# Altium PCB LSS-P-PCB-B v3.4.PcbDoc (part 1 of 3)
Units mil, origin at the board's own origin, x right, y up, seen from the top; angles counter-clockwise.
Board outline 2702.17 x 2795.23 mil, 4 copper layers (Top Layer, Power, GND, Bottom Layer), stack 62.08 mil thick; 111 components, 108 nets, 410 pads, 256 vias.
Unrouted connection lines stored in the file: 1.
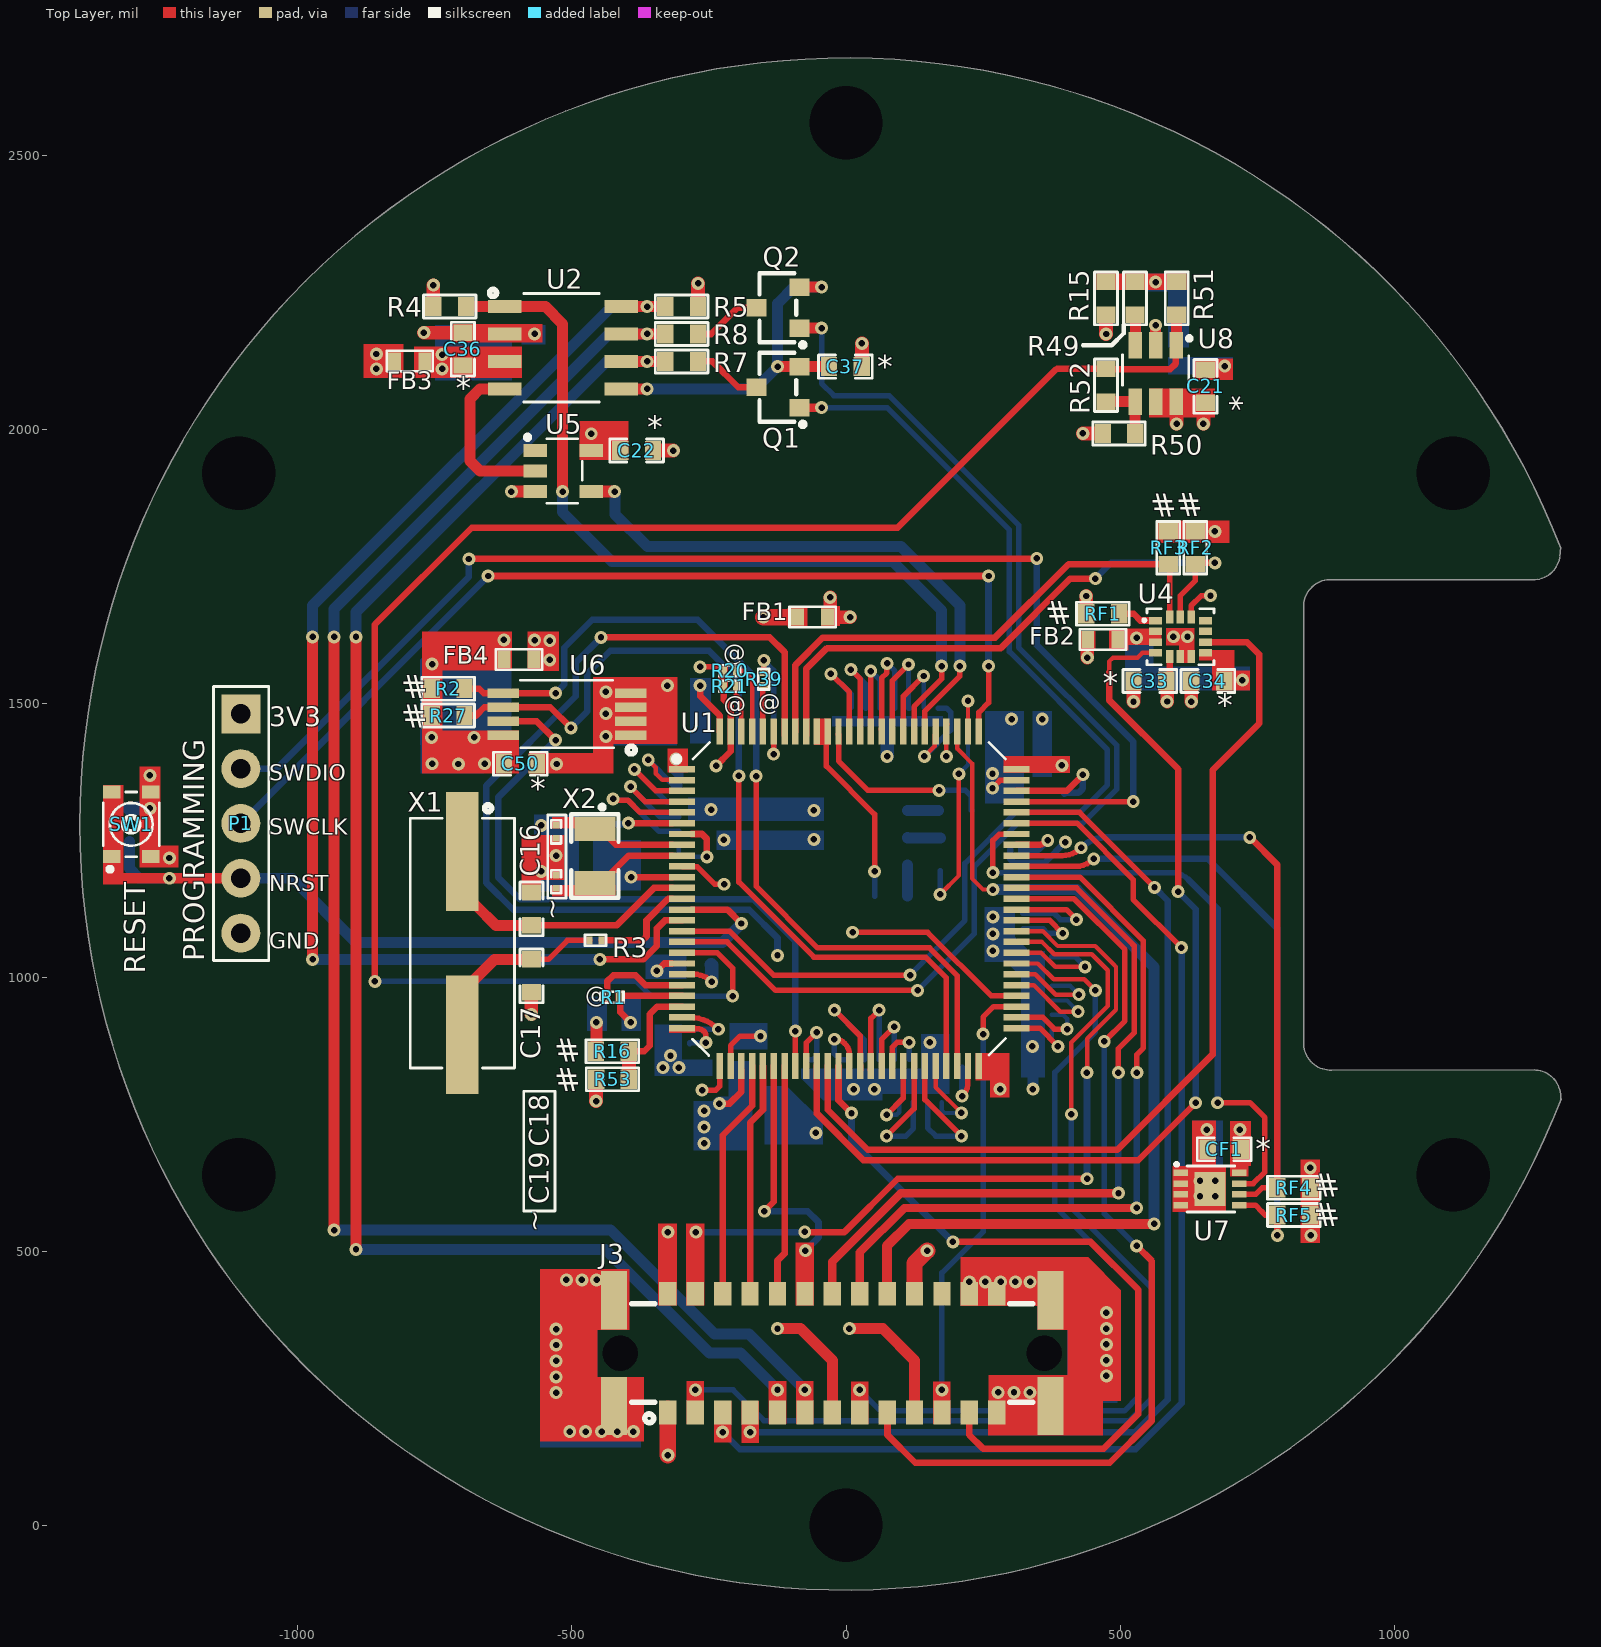
[diagram p0: Top Layer view]
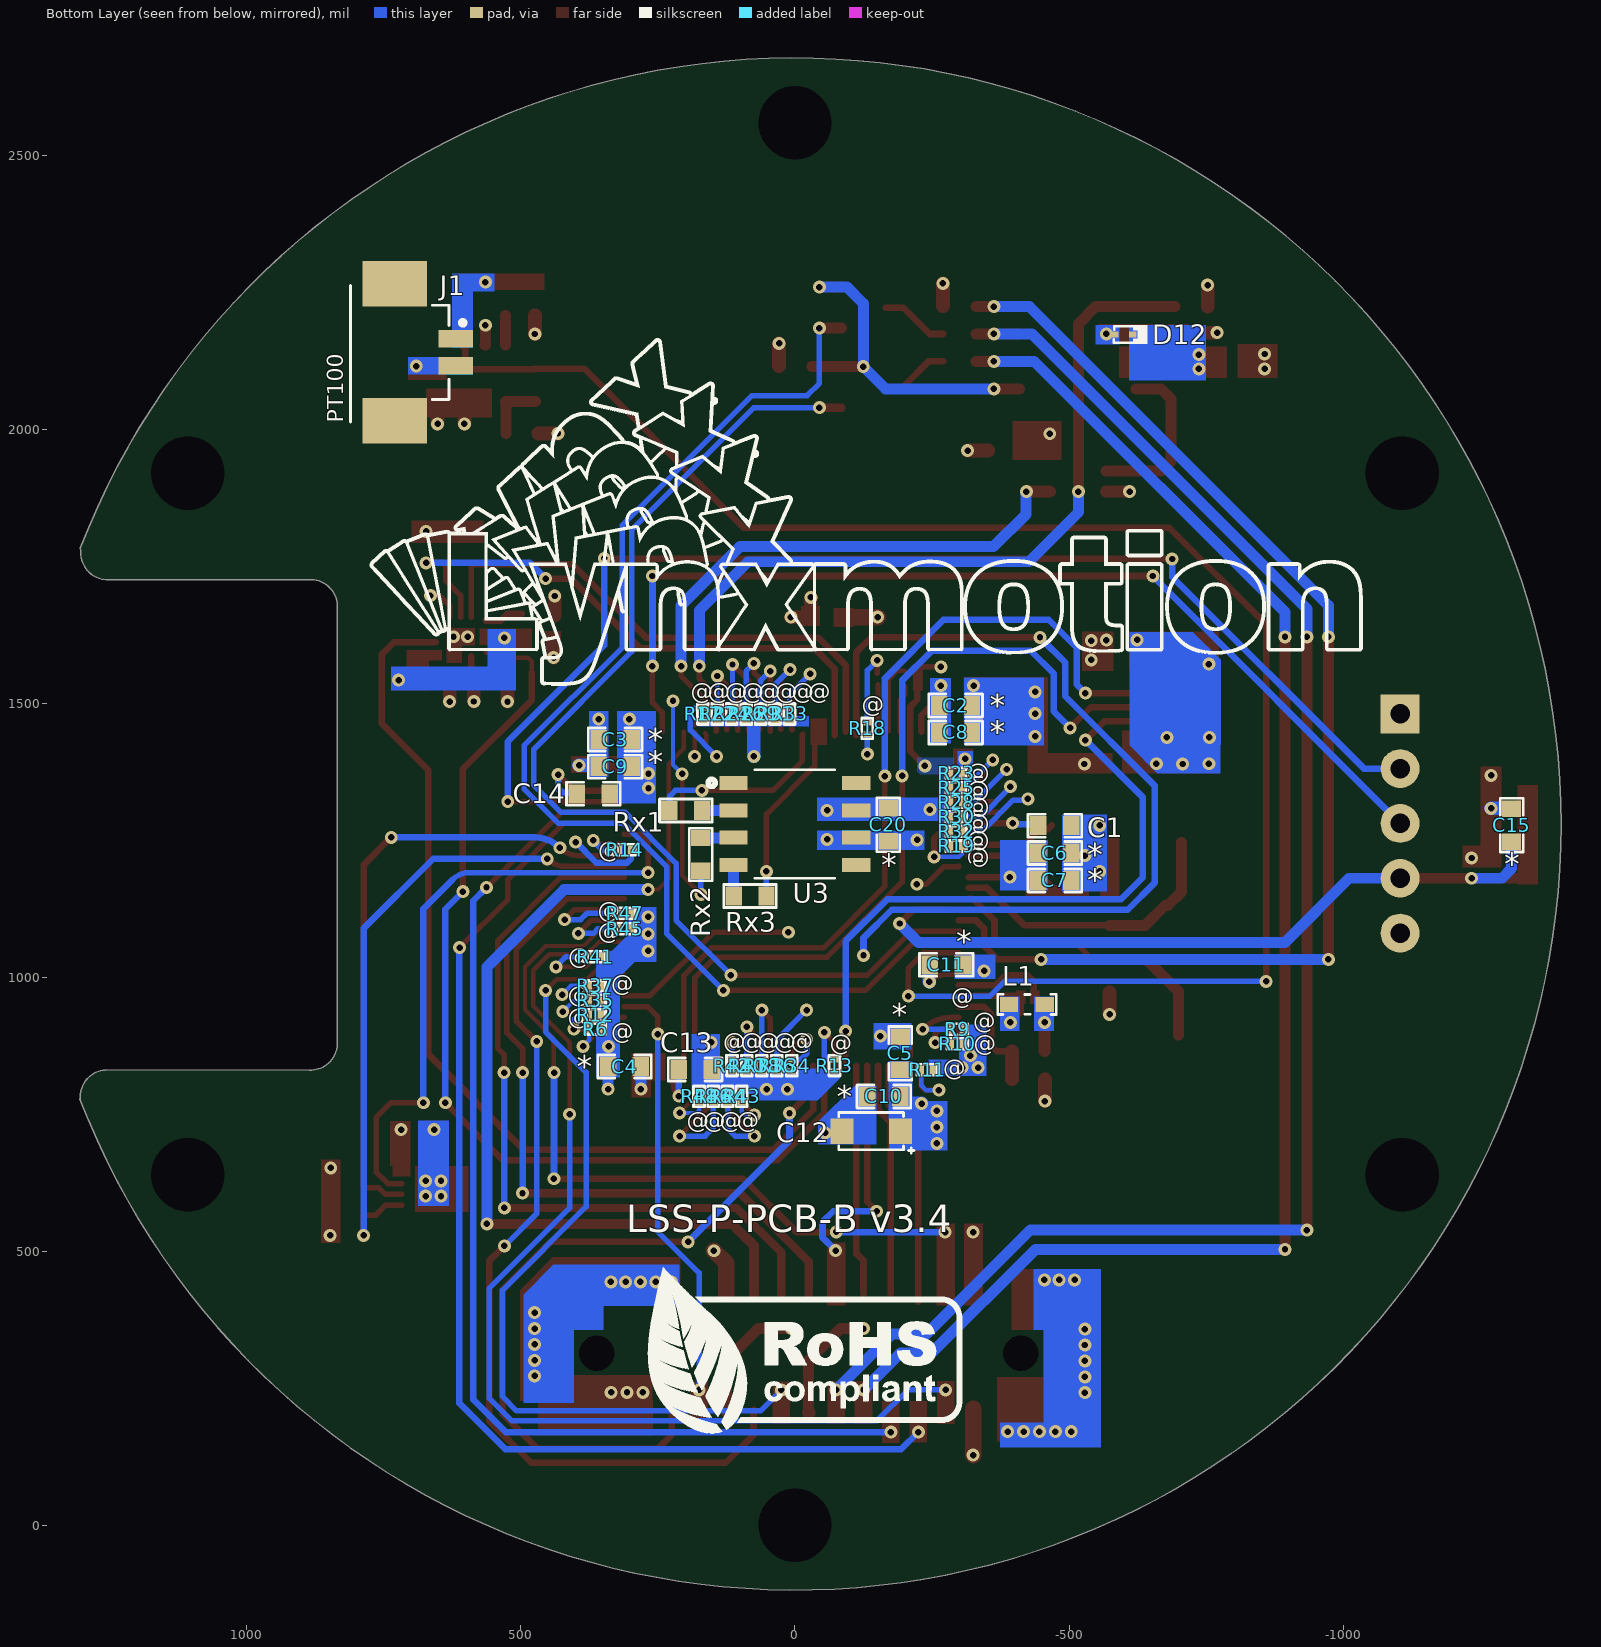
[diagram p1: Bottom Layer view, seen from below]
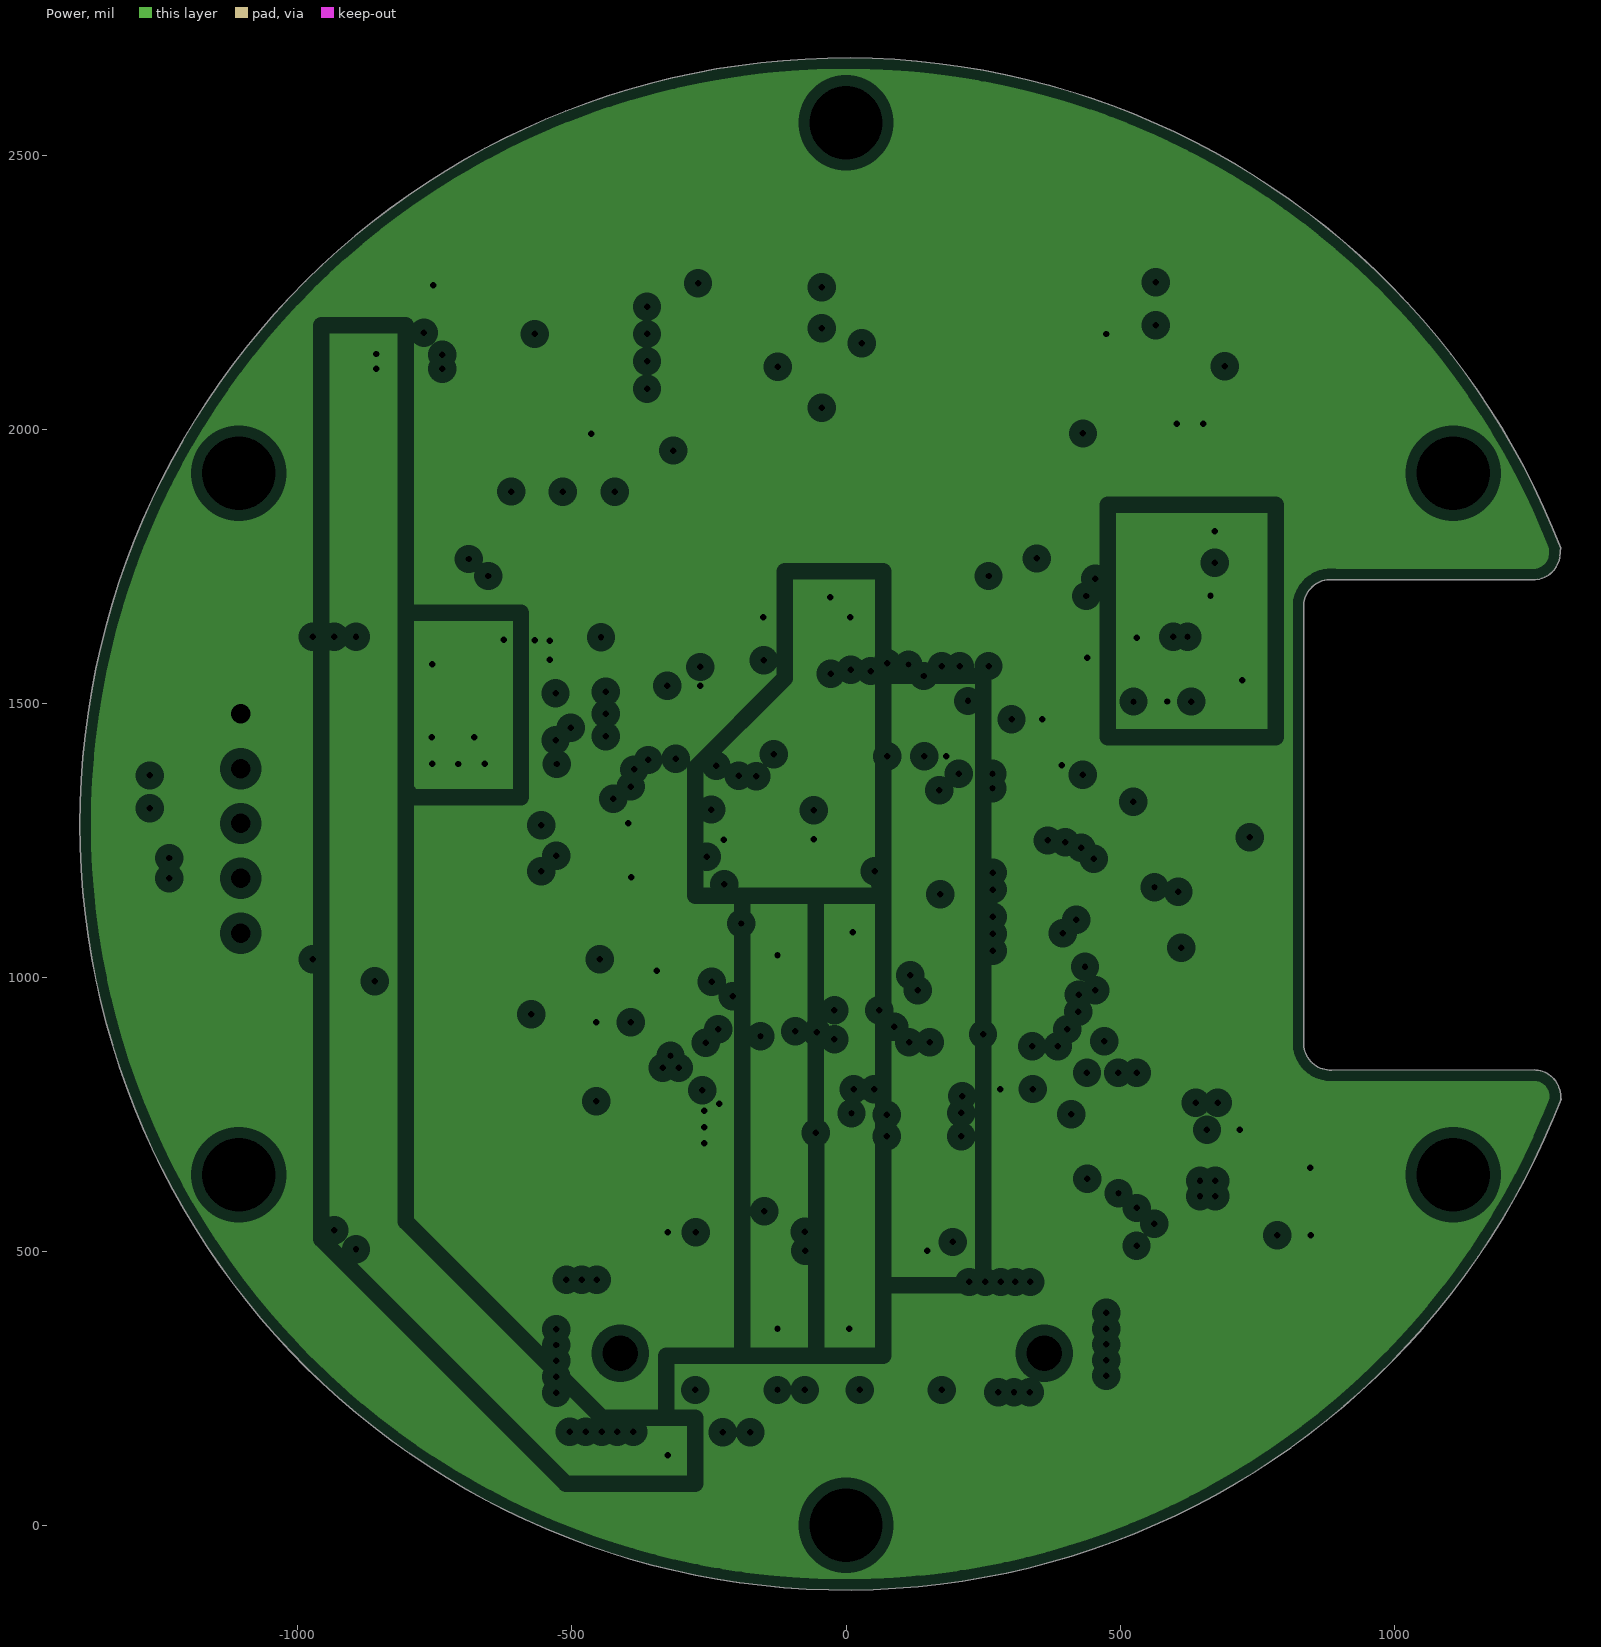
[diagram p2: Power, clearances drawn from the general rule]
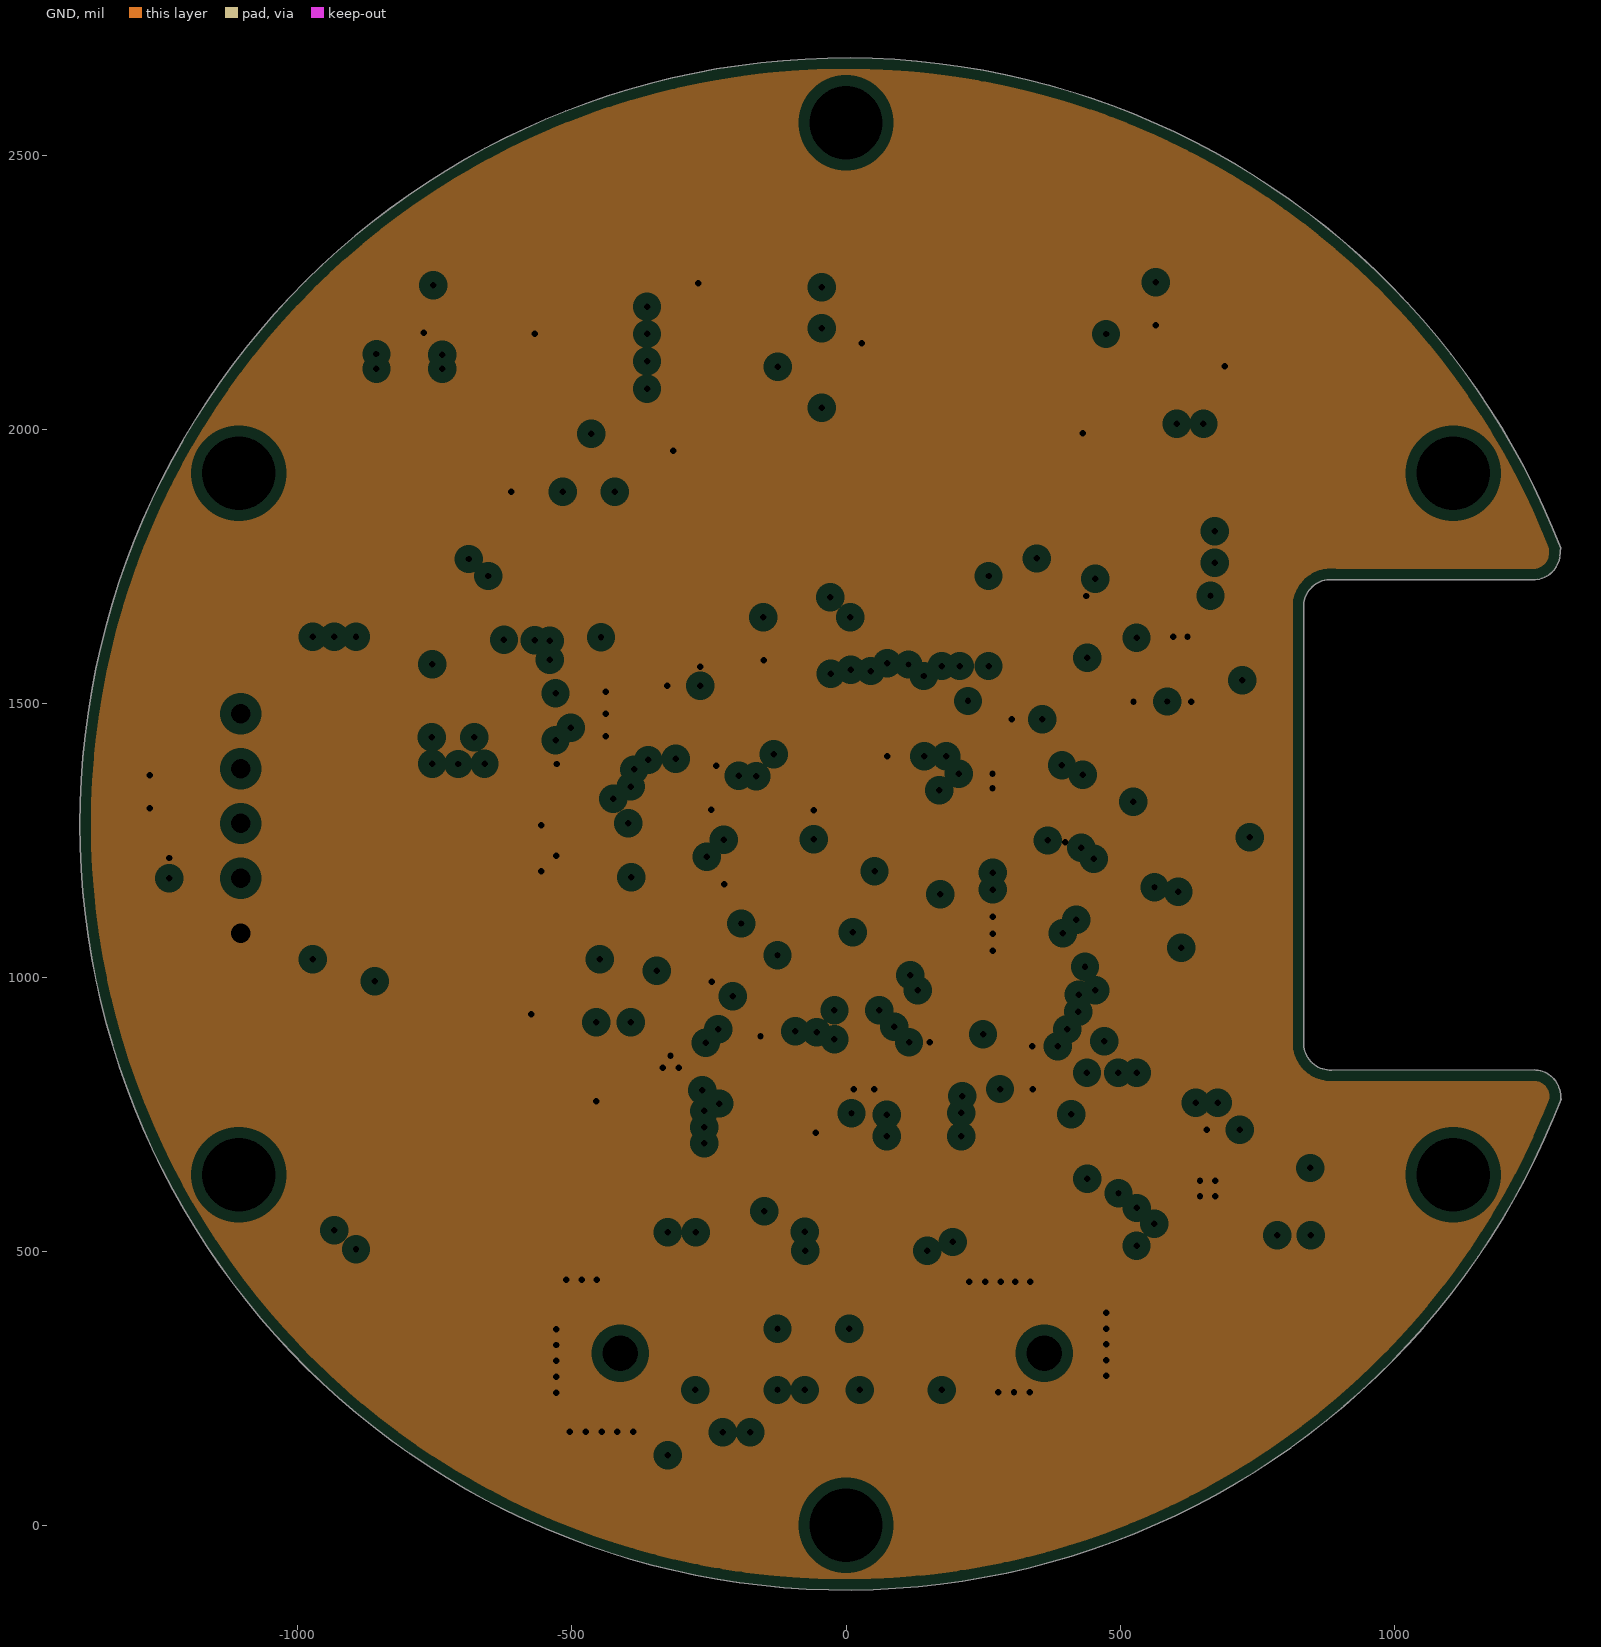
[diagram p3: GND, clearances drawn from the general rule]

## Layer stack, top to bottom
Top Solder: solder mask 0.5, Solder Resist, Dk 3.5
Top Layer: signal copper 1.7
Prepreg 1: prepreg 5, PP-015, Dk 4.3
Power: plane copper 1.7, net (Multiple Nets)
Core: core 45.28, FR-4, Dk 4.8
GND: plane copper 1.7, net GND
Prepreg 2: prepreg 5, PP-015, Dk 4.3
Bottom Layer: signal copper 1.7
Bottom Solder: solder mask 0.5, Solder Resist, Dk 3.5

## Board outline
835.4,885.52 ccw(c884,879.5) 886.01,830.57 886.01,830.67 1255.51,830.94 1258.51,830.61 cw(c1254.9,781.78) 1303.74,778.24 1304.53,777.94 cw(c0,1279.53) 1303.84,1782.91 1302.74,1777.49 cw(c1253.9,1773.96) 1257.51,1725.12 889.44,1725.12 889.44,1725.22 ccw(c884,1676.55) 835.4,1670.54

## Design rules (kind name [scope] priority, off if disabled: settings)
Clearance [All] p1: gap=7 ignorepadtopadclearanceinfootprint=FALSE except(5: Arc-SMDPad Track-SMDPad SMDPad-SMDPad)
ComponentClearance [All] p1: gap=1 collisioncheckmode=3 verticalgap=1 showdistances=FALSE
Height [All] p1: minheight=0 maxheight=10000 prefheight=500
HoleSize [All] p1: absolutevalues=TRUE maxlimit=1000 minlimit=1 maxpercent=80.000 minpercent=20.000
HoleToHoleClearance [All] p1: gap=0 allowstackedmicrovias=TRUE
MinimumSolderMaskSliver [All] p1: minsoldermaskwidth=0
PlaneClearance [All] p1: clearance=20
PlaneConnect [All] p1: planeconnectstyle=Direct reliefexpansion=20 reliefentries=4 reliefconductorwidth=10 reliefairgap=10
PolygonConnect [All] p1: connectstyle=Direct reliefconductorwidth=10 reliefentries=4 polygonreliefangle="90 Angle" airgapwidth=10
RoutingVias [All] p1: holewidth=11.81 width=23.62 viastyle="Through Hole" minholewidth=11.81 minwidth=23.62 maxholewidth=31.5 maxwidth=62.99
SilkToSilkClearance [All] p1: silktosilkclearance=0
SilkToSolderMaskClearance [IsPad] p1: minsilkscreentomaskgap=0 clearancetoexposedcopper=TRUE
SolderMaskExpansion SolderMaskExpansion_1 [Not IsVia] p1: expansion=4 istentingtop=FALSE
SolderMaskExpansion [IsVia] p2: expansion=6 istentingtop=TRUE soldermaskfromhole=TRUE
Width [All] p1: maxlimit=100 minlimit=8 preferedwidth=12
21 further rules are at their usual default settings.

## Classes and differential pairs
component class U_Temp_Probe_Section: C21 J1 R15 R49 R50 R51 R52 U8
component class U_Sensor-Section: C50 FB4 R2 R27 U6
component class U_Processing-Section: C1 C2 C3 C4 C5 C6 C7 C8 C9 C10 C11 C12 C13 C14 C15 C16 C17 C18 C19 CF1 L1 R1 R3 R6 R9 R10 R11 R12 R13 R14 R16 R17 R18 R19 R20 R21 R22 R23 R24 R25 R26 R28 R29 R30 R31 R32 R33 R34 R35 R36 R37 R38 R39 R40 R41 R42 R43 R44 R45 R46 R47 R48 R53 RF4 RF5 SW1 U1 U7 X1 X2
component class U_Motion-Sensor-Sheet: C33 C34 FB2 RF1 RF2 RF3 U4
component class U_Encoder-Sheet: C20 FB1 Rx1 Rx2 Rx3 U3
component class U_Connector-Section: J3 P1
component class U_CAN-Sheet: C22 C36 C37 D12 FB3 Q1 Q2 R4 R5 R7 R8 U2 U5

## Components (designator, comment, footprint, x,y, rotation, side; value= is the part's Value field where it differs from the comment)
C1 "4.7UF" Cap0603 -474,1276.53 r180 bottom locked
C2 "0.1UF" Cap0603 -293,1495.53 r180 bottom locked
C3 "0.1UF" Cap0603 328,1433.53 r180 bottom locked
C4 "0.1UF" Cap0603 311,837 r0 bottom
C5 "0.1UF" Cap0603 -192,861.16 r90 bottom locked
C6 "0.1UF" Cap0603 -474,1226.53 r180 bottom locked
C7 "0.1UF" Cap0603 -474,1176.53 r180 bottom locked
C8 "0.1UF" Cap0603 -293,1446.53 r180 bottom locked
C9 "0.1UF" Cap0603 328,1384.16 r180 bottom locked
C10 "0.1uF" Cap0603 -162,782.53 r0 bottom locked
C11 "0.1UF" Cap0603 -276,1022.53 r0 bottom
C12 "1UF" "CAP-CASE A" -139,719 r0 bottom locked
C13 "2.2uF" "Cap 0603" 182,831.53 r0 bottom locked
C14 "2.2uF" "Cap 0603" 368,1334.53 r0 bottom locked
C15 "0.1UF" Cap0603 -1307.5,1277.53 r90 bottom locked
C16 "30pF" "Cap 0603" -574,1124.53 r270 top
C17 "30pF" "Cap 0603" -574,1002.53 r90 top
C18 "10pF" "CAP 0201" -529,1265.16 r90 top locked
C19 "10pF" "CAP 0201" -529,1174.16 r270 top locked
C20 "0.1uF" "Cap 0603" -170,1278 r90 bottom
C21 "0.1UF" "Cap 0603" 656,2078 r90 top
C22 "0.1uF" "Cap 0603" -382.19,1960.93 r0 top locked
C33 "0.1UF" Cap0603 554.5,1540.34 r180 top
C34 "0.1UF" Cap0603 660,1540.34 r180 top
C36 "0.1UF" Cap0603 -699,2146 r90 top locked
C37 "0.1UF" Cap0603 -1,2114 r0 top
C50 "0.1UF" Cap0603 -594,1389.47 r0 top
CF1 "0.1uF" "Cap 0603" 690,686 r180 top locked
D12 "ESD9L5.0ST5G" SOD-923 -599.54,2172.53 r0 bottom locked
FB1 "MPZ1608S121ATDH5" MPZ1608S121ATDH5 -61.13,1657 r0 top locked
FB2 "MPZ1608S121ATDH5" MPZ1608S121ATDH5 468.56,1616 r0 top locked
FB3 "MPZ1608S121ATDH5" MPZ1608S121ATDH5 -796.12,2124 r0 top locked
FB4 "MPZ1608S121ATDH5" MPZ1608S121ATDH5 -596.5,1580 r180 top
J1 "1.25-2PWB" 1.25-2PWB 682,2140 r270 bottom locked
J3 "M55-6012642R" M55-6012642R -25,314.26 r0 top locked
L1 "FBMH1608HL121-TV" "IND 0603" -423,950.52 r0 bottom
P1 "SMC-1-05-1-GT" SMC-1-05-1-GT -1104,1280.53 r270 top locked
Q1 "MMBT2222A-7-F" SOT-23 -124,2076.53 r90 top locked
Q2 "MMBT2222A-7-F" SOT-23 -124,2221.53 r90 top locked
R1 "0R" Res-0201 -425,963.53 r0 top locked
R2 "10K" Res0603 -726,1526.47 r180 top locked
R3 "806R" Res-0201 -457.02,1067.34 r180 top locked
R4 "1K" Res0603 -723,2223.53 r180 top locked
R5 "1K" Res0603 -300,2223.53 r0 top locked
R6 "0R" Res-0201 364.83,905.4 r180 bottom
R7 "57R6" Res0603 -300,2123.53 r180 top locked
R8 "57R6" Res0603 -300,2173.53 r180 top locked
R9 "0R" Res-0201 -295.83,905.03 r0 bottom
R10 "0R" Res-0201 -295.83,878.53 r0 bottom
R11 "0R" Res-0201 -241.05,831.04 r0 bottom locked
R12 "0R" Res-0201 364.83,931.66 r180 bottom
R13 "0R" Res-0201 -72,838.7 r90 bottom locked
R14 "0R" Res-0201 310.17,1232.53 r0 bottom locked
R15 "3.01K" Res0603 474.4,2238.44 r90 top
R16 "DNP" Res0603 -426.19,865 r0 top
R17 "0R" Res-0201 168,1480.28 r90 bottom locked
R18 "0R" Res-0201 -132,1454 r90 bottom
R19 "0R" Res-0201 -294,1239.53 r180 bottom locked
R20 "0R" Res-0201 -212,1559 r0 top
R21 "0R" Res-0201 -212,1531 r0 top
R22 "0R" Res-0201 141.67,1480.28 r270 bottom locked
R23 "0R" Res-0201 -294,1372.04 r180 bottom locked
R24 "0R" Res-0201 115.33,1480.28 r270 bottom locked
R25 "0R" Res-0201 -294,1345.81 r180 bottom locked
R26 "0R" Res-0201 89,1480.28 r270 bottom locked
R27 "10K" Res0603 -726,1477.47 r180 top locked
R28 "0R" Res-0201 -294,1319.24 r180 bottom locked
R29 "0R" Res-0201 62.67,1480.28 r270 bottom locked
R30 "0R" Res-0201 -294,1292.67 r180 bottom locked
R31 "0R" Res-0201 36.33,1480.28 r270 bottom locked
R32 "0R" Res-0201 -294,1266.1 r180 bottom locked
R33 "0R" Res-0201 10,1480.28 r270 bottom locked
R34 "0R" Res-0201 6,838.7 r90 bottom locked
R35 "0R" Res-0201 364.83,957.93 r180 bottom
R36 "0R" Res-0201 33.25,838.7 r90 bottom locked
R37 "0R" Res-0201 364.83,984.19 r180 bottom
R38 "0R" Res-0201 60.5,838.7 r90 bottom locked
R39 "0R" Res-0201 -150,1544 r90 top
R40 "0R" Res-0201 87.75,838.7 r90 bottom locked
R41 "0R" Res-0201 364.83,1037.53 r180 bottom locked
R42 "0R" Res-0201 115,838.7 r90 bottom locked
R43 "0R" Res-0201 97,782.53 r270 bottom locked
R44 "0R" Res-0201 123,782.53 r270 bottom locked
R45 "0R" Res-0201 310.17,1088.53 r180 bottom locked
R46 "0R" Res-0201 149,782.53 r270 bottom locked
R47 "0R" Res-0201 310.17,1116.53 r180 bottom locked
R48 "0R" Res-0201 175,782.53 r270 bottom locked
R49 "11K" Res0603 527.4,2238.44 r90 top
R50 "12.4K" Res0603 498,1992 r180 top
R51 "11.8K" Res0603 603.4,2238.44 r270 top
R52 "105K" Res0603 474.4,2080 r90 top
R53 "DNP" Res0603 -426,814 r0 top
RF1 "10K" Res0603 468.69,1663 r0 top locked
RF2 "10K" Res0603 637,1783.53 r90 top locked
RF3 "10K" Res0603 588,1783.53 r90 top locked
RF4 "10K" Res0603 817,616 r180 top locked
RF5 "10K" Res0603 817,566 r180 top locked
Rx1 "100R" Res0603 199,1304 r0 bottom locked
Rx2 "100R" Res0603 172,1224 r270 bottom locked
Rx3 "470R" Res0603 82,1148 r180 bottom locked
SW1 "GT-TC025D-H0065-L1" GT-TC025D-H0065-L1 -1304,1279 r90 top locked
U1 "STM32F407VET6" LQFP-100 6,1143.16 r0 top locked
U2 "SN65HVDA1040AQDRQ1" SOIC-8 -516,2148.53 r0 top locked
U3 "TLE5012BE1000" PG-DSO-8 0,1279.53 r180 bottom locked
U4 "LSM6DSLTR" "14 LGA (2.5x3)" 610.17,1621.15 r0 top locked
U5 "SN74LV1T34DBVR" SOT-23-5 -516,1923.53 r0 top locked
U6 "MCP9805-BE/ST" 8-TSSOP -509,1479.84 r180 top locked
U7 "CAT24C32HU4I-GT3" "8-UDFN-EP (2x3)" 664,613.53 r0 top locked
U8 "MAX4236EUT+T" SOT-23-6 565.4,2101.44 r270 top locked
X1 "20MHz" HCM4920000000ABJT -699,1063.21 r270 top locked
X2 "ECS-.327-7-34B-C-TR" ECS-.327-7-34B-C-TR -458,1221.16 r270 top locked

## Footprints (in the part's own frame and the unit in brackets; to place one, negate y for a bottom-side part, rotate by r counter-clockwise, add the part's x,y. Pads: shape width x height; smd on the part's side, far side on the other; paste and mask are expansions set on the pad)
1.25-2PWB [mm]
  rect 0.8x1.6 smd: 1(-0.625,1.6) 2(0.625,1.6)
  rect 2.1x3 smd: MP1(-3.175,-1.219) MP2(3.175,-1.219)
  silkscreen extent -3.1,-3.28 3.23,1.96, body extent -3.62,-3.21 3.63,2.04, height 3.5
8-TSSOP [mm] "IC SENSOR THERMAL 3.0V 8TSSOP"
  rect 1.45x0.45 smd: 1(-2.95,0.975) 2(-2.95,0.325) 3(-2.95,-0.325) 4(-2.95,-0.975) 5(2.95,-0.975) 6(2.95,-0.325) 7(2.95,0.325) 8(2.95,0.975)
  silkscreen extent -3.15,-1.57 2.17,1.84, body extent -3.2,-1.55 3.2,1.55, height 1.09
"8-UDFN-EP (2x3)" [mm]
  rect 0.68x0.3 smd: 1(-1.36,0.75) 2(-1.36,0.25) 3(-1.36,-0.25) 4(-1.36,-0.75) 5(1.36,-0.75) 6(1.36,-0.25) 7(1.36,0.25) 8(1.36,0.75)
  rect 1.45x1.56 smd: 9(0,0)
  silkscreen extent -1.57,-1.07 1.14,1.17, body extent -1.55,-1 1.55,1, height 0.81
"14 LGA (2.5x3)" [mm]
  rect 0.61x0.35 smd paste+0 mask+0.055: 1(-1.16,0.75) 2(-1.16,0.25) 3(-1.16,-0.25) 4(-1.16,-0.75) 8(1.16,-0.75) 9(1.16,-0.25) 10(1.16,0.25) 11(1.16,0.75)
  rect 0.35x0.61 smd paste+0 mask+0.055: 5(-0.5,-0.91) 6(0,-0.91) 7(0.5,-0.91) 12(0.5,0.91) 13(0,0.91) 14(-0.5,0.91)
  silkscreen extent -1.75,-1.3 1.55,1.3, body extent -1.5,-1.25 1.5,1.25, height 0.95
Cap0603 [mil]
  rect 30x35 smd mask+2.36: 1(-30,0) 2(30,0)
  silkscreen extent -49,-21 49,21, body extent -32,-16 31,16, height 34
"CAP 0201" [mm]
  rect 0.3x0.3 smd mask+0.055: 1(-0.3,0) 2(0.3,0)
  silkscreen extent -0.53,-0.23 0.53,0.23, body extent -0.3,-0.15 0.3,0.15, height 0.28
"Cap 0603" [mil]
  rect 30x35 smd mask+2.36: 1(-30,0) 2(30,0)
  silkscreen extent -49,-21 49,21, body extent -32,-16 31,16, height 34
"CAP-CASE A" [mm]
  rect 1.06x1.19 smd: 1(-1.355,0) 1(-1.355,0) 2(1.355,0)
  silkscreen extent -1.98,-0.86 1.5,1.01, body extent -1.6,-0.8 1.6,0.8, height 1.8
ECS-.327-7-34B-C-TR [mm] "CRYSTAL 32.7680KHZ 12.5PF SMD"
  rect 1.1x1.9 smd: 1(-1.25,0) 2(1.25,0)
  silkscreen extent -2.34,-1.09 1.93,1.09, body extent -1.6,-0.78 1.6,0.72, height 0.87
GT-TC025D-H0065-L1 [mm]
  rect 0.6x0.8 smd: 1(-1.5,0.9) 2(1.5,0.9) 3(1.5,-0.9) 4(-1.5,-0.9)
  silkscreen extent -2.16,-1.3 1.5,1.3, body extent -1.7,-1.3 1.7,1.3, height 0.6
HCM4920000000ABJT [mm] "CRYSTAL 20.0000MHZ 18PF SMD"
  rect 5.5x1.5 smd: 1(-4.225,-0.025) 2(4.275,-0.025)
  silkscreen extent -6.39,-2.44 5.82,2.39, body extent -6.37,-2.44 6.43,2.39, height 4.3
"IND 0603" [mm]
  rect 0.85x0.7 smd: 1(-0.825,0) 2(0.825,0)
  silkscreen extent -1.36,-0.47 1.35,0.47, body extent -0.8,-0.4 0.8,0.4, height 0.8
LQFP-100 [mm]
  rect 1.2x0.3 smd: 1(-7.75,6) 2(-7.75,5.5) 3(-7.75,5) 4(-7.75,4.5) 5(-7.75,4) 6(-7.75,3.5) 7(-7.75,3) 8(-7.75,2.5) 9(-7.75,2) 10(-7.75,1.5) 11(-7.75,1) 12(-7.75,0.5) 13(-7.75,0) 14(-7.75,-0.5) 15(-7.75,-1) 16(-7.75,-1.5) 17(-7.75,-2) 18(-7.75,-2.5) 19(-7.75,-3) 20(-7.75,-3.5) 21(-7.75,-4) 22(-7.75,-4.5) 23(-7.75,-5) 24(-7.75,-5.5) 25(-7.75,-6) 51(7.75,-6) 52(7.75,-5.5) 53(7.75,-5) 54(7.75,-4.5) 55(7.75,-4) 56(7.75,-3.5) 57(7.75,-3) 58(7.75,-2.5) 59(7.75,-2) 60(7.75,-1.5) 61(7.75,-1) 62(7.75,-0.5) 63(7.75,0) 64(7.75,0.5) 65(7.75,1) 66(7.75,1.5) 67(7.75,2) 68(7.75,2.5) 69(7.75,3) 70(7.75,3.5) 71(7.75,4) 72(7.75,4.5) 73(7.75,5) 74(7.75,5.5) 75(7.75,6)
  rect 0.3x1.2 smd: 26(-6,-7.75) 27(-5.5,-7.75) 28(-5,-7.75) 29(-4.5,-7.75) 30(-4,-7.75) 31(-3.5,-7.75) 32(-3,-7.75) 33(-2.5,-7.75) 34(-2,-7.75) 35(-1.5,-7.75) 36(-1,-7.75) 37(-0.5,-7.75) 38(0,-7.75) 39(0.5,-7.75) 40(1,-7.75) 41(1.5,-7.75) 42(2,-7.75) 43(2.5,-7.75) 44(3,-7.75) 45(3.5,-7.75) 46(4,-7.75) 47(4.5,-7.75) 48(5,-7.75) 49(5.5,-7.75) 50(6,-7.75) 76(6,7.75) 77(5.5,7.75) 78(5,7.75) 79(4.5,7.75) 80(4,7.75) 81(3.5,7.75) 82(3,7.75) 83(2.5,7.75) 84(2,7.75) 85(1.5,7.75) 86(1,7.75) 87(0.5,7.75) 88(0,7.75) 89(-0.5,7.75) 90(-1,7.75) 91(-1.5,7.75) 92(-2,7.75) 93(-2.5,7.75) 94(-3,7.75) 95(-3.5,7.75) 96(-4,7.75) 97(-4.5,7.75) 98(-5,7.75) 99(-5.5,7.75) 100(-6,7.75)
  silkscreen extent -8.13,-7.27 7.24,7.24, body extent -8,-8 8,8, height 1.6
M55-6012642R [mm]
  rect 0.8x1.1 smd: A1(-7.62,-2.75) A2(-6.35,-2.75) A3(-5.08,-2.75) A4(-3.81,-2.75) A5(-2.54,-2.75) A6(-1.27,-2.75) A7(0,-2.75) A8(1.27,-2.75) A9(2.54,-2.75) A10(3.81,-2.75) A11(5.08,-2.75) A12(6.35,-2.75) A13(7.62,-2.75) B1(-7.62,2.75) B2(-6.35,2.75) B3(-5.08,2.75) B4(-3.81,2.75) B5(-2.54,2.75) B6(-1.27,2.75) B7(0,2.75) B8(1.27,2.75) B9(2.54,2.75) B10(3.81,2.75) B11(5.08,2.75) B12(6.35,2.75) B13(7.62,2.75)
  round 0 hole 1.65 unplated: MH1(-9.83,0) MH2(9.83,0)
  rect 1.2x2.7 smd: MP1(-10.115,-2.45) MP2(-10.115,2.45) MP3(10.115,-2.45) MP4(10.115,2.45)
  silkscreen extent -9.3,-3.23 9.3,2.29, body extent -10.79,-3.6 10.8,3.63, height 9.02
MPZ1608S121ATDH5 [mm] "FERRITE BEAD 120 OHM 0603 1LN"
  rect 0.6x0.8 smd: 1(-0.7,0) 2(0.7,0)
  silkscreen extent -1.07,-0.47 1.07,0.47, body extent -0.8,-0.4 0.8,0.4, height 0.78
PG-DSO-8 [mm]
  rect 1.31x0.65 smd: 1(-2.845,1.905) 2(-2.845,0.635) 3(-2.845,-0.635) 4(-2.845,-1.905) 5(2.845,-1.905) 6(2.845,-0.635) 7(2.845,0.635) 8(2.845,1.905)
  silkscreen extent -4.02,-2.51 1.83,2.51, body extent -3,-2.45 3,2.45, height 1.7
Res0603 [mil]
  rect 30x35 smd: 1(-30,0) 2(30,0)
  silkscreen extent -48,-21 48,21, body extent -31,-17 31,17, height 18
Res-0201 [mm]
  rect 0.27x0.37 smd: 1(-0.275,0) 2(0.275,0)
  silkscreen extent -0.48,-0.25 0.48,0.25, body extent -0.3,-0.15 0.3,0.15, height 0.29
SMC-1-05-1-GT [mm]
  rect 1.8x1.8 hole 0.9: 1(-5.08,0)
  round 1.8 hole 0.9: 2(-2.54,0) 3(0,0) 4(2.54,0) 5(5.08,0)
  silkscreen extent -6.35,-1.27 6.35,1.3, body extent -6.32,-1.28 6.38,1.26, height 7
SOD-923 [mm]
  rect 0.36x0.27 smd: 1(-0.42,0) 2(0.42,0)
  silkscreen extent -1.12,-0.43 0.46,0.43, body extent -0.52,-0.32 0.53,0.32, height 0.43
SOIC-8 [mm]
  rect 1.55x0.6 smd: 1(-2.7,1.905) 2(-2.7,0.635) 3(-2.7,-0.635) 4(-2.7,-1.905) 5(2.7,-1.905) 6(2.7,-0.635) 7(2.7,0.635) 8(2.7,1.905)
  silkscreen extent -3.41,-2.51 1.68,2.7, body extent -3,-2.45 3,2.45, height 1.7
SOT-23 [mm] "TRANS NPN 40V 0.6A SOT23"
  rect 0.82x0.92 smd: 1(-0.95,-1) 2(0.95,-1) 3(0,1)
  silkscreen extent -1.82,-1.23 1.6,0.86, body extent -1.5,-1.25 1.5,1.25, height 1.05
SOT-23-5 [mm]
  rect 1.1x0.6 smd: 1(-1.3,0.95) 2(-1.3,0) 3(-1.3,-0.95) 4(1.3,-0.95) 5(1.3,0.95)
  silkscreen extent -1.74,-1.5 0.88,1.65, body extent -1.4,-1.45 1.4,1.45, height 1.45
SOT-23-6 [mm] "IC OPAMP GP 1 CIRCUIT SOT23-6"
  rect 1.22x0.62 smd: 1(-1.31,0.95) 2(-1.31,0) 3(-1.31,-0.95) 4(1.31,-0.95) 5(1.31,0) 6(1.31,0.95)
  silkscreen extent -1.69,-1.55 0.6,1.62, body extent -1.5,-1.5 1.5,1.5, height 1.47

## Part data
C1: library part CL10A475KA8NQNC, "CAP CER 4.7UF 25V X5R 0603", Capacitance=4.7uF, Case Code (Imperial)=0603, Case Code (Metric)=1608, Dielectric=X5R, Manufacturer=Samsung, Max Operating Temperature=85°C, Min Operating Temperature=-55°C, Package Quantity=1, Supplier Part Number 1=1276-1900-1-ND, Tolerance=10%, Voltage Rating=25V, Case/Package=0603, ComponentLink1Description=http://www.samsungsem.com/kr/support/product-search/mlcc/CL10A475KA8NQNC.jsp?src-supplier=Digi-Key, ComponentLink1URL=http://www.samsungsem.com/kr/support/product-search/mlcc/CL10A475KA8NQNC.jsp?src-supplier=Digi-Key, Contact Plating=Tin, Depth=0.8mm, Lead Free="Lead Free", Length=1.6mm, Manufacturer Part Number=CL10A475KA8NQNC, Mount="Surface Mount", Packaging="Tape and Reel", Pricing 1="1=0.37, 10=0.255, 100=0.1528, 500=0.11456, 1000=0.09675 (USD)", Stock 1=2252340, Supplier 1=Digi-Key, Termination=Wraparound, Thickness=0.035inch, Width=0.031inch
C2 C3 C4 C5 C6 C7 C8 C9 C10 C11 C15 C33 C34 C36 C37 C50 CF1: library part CL10B104KB8NNNC, "Cap Ceramic 0.1uF 50VDC X7R 10% SMD 0603 Paper T/R", Capacitance=100nF, Case/Package=0603, Case Code (Metric)=1608, Dielectric=X7R, Manufacturer=Samsung, Max Operating Temperature=125°C, Min Operating Temperature=-55°C, Package Quantity=1, Supplier Part Number 1=1276-1000-1-ND, Tolerance=10%, Voltage=50V, Case Code (Imperial)=0603, Category="Ceramic Capacitors", ComponentLink1Description=https://datasheet.ciiva.com/25803/cl10b104kb8nnnc-25803393.pdf?src-supplier=Digi-Key, ComponentLink1URL=https://datasheet.ciiva.com/25803/cl10b104kb8nnnc-25803393.pdf?src-supplier=Digi-Key, ComponentLink2Description=https://datasheet.ciiva.com/26838/getdatasheetpartid-89097-26838411.pdf?src-supplier=Verical, ComponentLink2URL=https://datasheet.ciiva.com/26838/getdatasheetpartid-89097-26838411.pdf?src-supplier=Verical, ComponentLink3Description=https://datasheet.ciiva.com/29198/456651-da-01-en-vs-kondensator-0605-29198839.pdf?src-supplier=Conrad, ComponentLink3URL=https://datasheet.ciiva.com/29198/456651-da-01-en-vs-kondensator-0605-29198839.pdf?src-supplier=Conrad, Construction=Flat, Contact Plating=Tin, Depth=0.8mm, Height=0.8mm, Lead Free="Lead Free", Length=1.6mm, Manufacturer Part Number=CL10B104KB8NNNC, Material=Ceramic, Mount="Surface Mount", Packaging="Tape and Reel", Pricing 1="1=0.10000, 10=0.03000, 50=0.01640, 100=0.01340, 500=0.00954, 1000=0.00750 (USD)", Radiation Hardening=No, RoHS=Yes, RoHS Compliant=Yes, Series=CL, Stock 1=3998791, Supplier 1=Digi-Key, Thickness=0.035inch, Voltage Rating=50V, Voltage Rating (DC)=50V, Width=0.031inch
C12: library part TAJA105K016RNJ, "CAP TANT 1UF 10% 16V 1206", Capacitance=1uF, Case Code (Imperial)=1206, Case Code (Metric)=3216, Dielectric Material=Tantalum, ESR (Equivalent Series Resistance)=11R, Leakage Current=500nA, Manufacturer="Kyocera AVX", Max Operating Temperature=125°C, Min Operating Temperature=-55°C, Package Quantity=1, Tolerance=20%, Voltage=16V, Case/Package=1206, Category="Tantalum Capacitors", ComponentLink1Description=https://datasheet.ciiva.com/18710/taj-eng-18710647.pdf?src-supplier=Distrelec, ComponentLink1URL=https://datasheet.ciiva.com/18710/taj-eng-18710647.pdf?src-supplier=Distrelec, ComponentLink2Description=https://datasheet.ciiva.com/7832/taj-7832811.pdf?src-supplier=Element14, ComponentLink2URL=https://datasheet.ciiva.com/7832/taj-7832811.pdf?src-supplier=Element14, ComponentLink3Description=https://datasheet.ciiva.com/7832/taj-7832810.pdf?src-supplier=Element14, ComponentLink3URL=https://datasheet.ciiva.com/7832/taj-7832810.pdf?src-supplier=Element14, ComponentLink4Description=https://datasheet.ciiva.com/7832/1680476-7832431.pdf?src-supplier=Element14, ComponentLink4URL=https://datasheet.ciiva.com/7832/1680476-7832431.pdf?src-supplier=Element14, ComponentLink5Description=https://datasheet.ciiva.com/263/taj-263410.pdf?src-supplier=Digi-Key, ComponentLink5URL=https://datasheet.ciiva.com/263/taj-263410.pdf?src-supplier=Digi-Key, ComponentLink6Description=https://datasheet.ciiva.com/263/taj-263409.pdf?src-supplier=Digi-Key, ComponentLink6URL=https://datasheet.ciiva.com/263/taj-263409.pdf?src-supplier=Digi-Key, ComponentLink7Description=https://datasheet.ciiva.com/263/taj-263411.pdf?src-supplier=Digi-Key, ComponentLink7URL=https://datasheet.ciiva.com/263/taj-263411.pdf?src-supplier=Digi-Key, ComponentLink8Description=https://datasheet.ciiva.com/7832/1703059-7832429.pdf?src-supplier=Element14, ComponentLink8URL=https://datasheet.ciiva.com/7832/1703059-7832429.pdf?src-supplier=Element14, ComponentLink9Description=https://datasheet.ciiva.com/7832/1703059-7832430.pdf?src-supplier=Element14, ComponentLink9URL=https://datasheet.ciiva.com/7832/1703059-7832430.pdf?src-supplier=Element14, Depth=1.6mm, Dissipation Factor=4%, Features="General Purpose", Height=1.6mm, Height - Seated (Max)=0.071inch, Lead Free="Lead Free", Lead Pitch=1.1mm, Length=3.2mm, Manufacturer Part Number=TAJA105K016RNJ, Mount="Surface Mount,PCB", Number of Pins=2, Packaging="Tape and Reel", Polarity=Polar, Pricing 1="1=0.35550, 10=0.26530, 25=0.25530, 100=0.16440, 250=0.14790, 500=0.10860, 1000=0.10750 (USD)", Radiation Hardening=No, REACH SVHC="No SVHC", RoHS=Yes, RoHS Compliant=Yes, Series=TAJ, Stock 1=1933, Supplier 1="Arrow Electronics", Supplier Part Number 1=TAJA105K016RNJ, Termination=SMD/SMT, Voltage Rating=16V, Voltage Rating (DC)=16V, Weight=0.000571oz, Width=1.6mm
C13 C14: library part GRM188R6YA225KA12D, "CAP, 2.2µF, 35V, 10%, X5R, 0603", Case/Package=0603, Case Code (Metric)=1608, Dielectric=X5R, Manufacturer=Murata, Max Operating Temperature=85°C, Min Operating Temperature=-55°C, Package Quantity=4000, Supplier Part Number 1=490-7204-1-ND, Tolerance=10%, Voltage=35V, Capacitance=2.2uF, Case Code (Imperial)=0603, Category="Ceramic Capacitors", ComponentLink1Description=https://datasheet.ciiva.com/14906/partnumbering-e-01-14906490.pdf?src-supplier=Digi-Key, ComponentLink1URL=https://datasheet.ciiva.com/14906/partnumbering-e-01-14906490.pdf?src-supplier=Digi-Key, ComponentLink2Description=https://datasheet.ciiva.com/14906/partnumbering-e-01-14906491.pdf?src-supplier=Digi-Key, ComponentLink2URL=https://datasheet.ciiva.com/14906/partnumbering-e-01-14906491.pdf?src-supplier=Digi-Key, ComponentLink3Description=https://datasheet.ciiva.com/14906/partnumbering-e-01-14906492.pdf?src-supplier=Digi-Key, ComponentLink3URL=https://datasheet.ciiva.com/14906/partnumbering-e-01-14906492.pdf?src-supplier=Digi-Key, Depth=0.8mm, Height=0.8mm, Lead Free="Lead Free", Length=1.6mm, Manufacturer Part Number=GRM188R6YA225KA12D, Material=Ceramic, Mount="Surface Mount", Packaging="Tape and Reel", Pricing 1="1=0.21000, 10=0.14100, 50=0.08480, 100=0.07170, 500=0.04904, 1000=0.04338 (USD)", REACH SVHC="No SVHC", RoHS=Yes, RoHS Compliant=Yes, Series=GRM, Stock 1=81665, Supplier 1=Digi-Key, Termination=SMD/SMT, Thickness=0.035inch, Voltage Rating=35V, Voltage Rating (DC)=35V, Weight=0.000222oz, Width=0.8mm
C16 C17: library part CC0603JRNPO9BN300, "CAP 30pF NP0 0603 50 V ±5 % SMD", Case Code (Imperial)=0603, Case Code (Metric)=1608, Dielectric=C0G, Insulation Resistance=10GR, Manufacturer=Yageo, Max Operating Temperature=125°C, Min Operating Temperature=-55°C, Resistor Type=Ceramic, Supplier Part Number 1=311-3357-1-ND, Tolerance=5%, Voltage Rating=50V, Capacitance=30pF, Case/Package=0603, Category="Ceramic Capacitors", ComponentLink1Description=https://datasheet.ciiva.com/26862/getdatasheetpartid-403531-26862766.pdf?src-supplier=Verical, ComponentLink1URL=https://datasheet.ciiva.com/26862/getdatasheetpartid-403531-26862766.pdf?src-supplier=Verical, ComponentLink2Description=https://datasheet.ciiva.com/13264/upy-gp-np0-16v-to-50v-8-3714-13264406.pdf?src-supplier=Mouser, ComponentLink2URL=https://datasheet.ciiva.com/13264/upy-gp-np0-16v-to-50v-8-3714-13264406.pdf?src-supplier=Mouser, ComponentLink3Description=https://datasheet.ciiva.com/7978/1132289-7978140.pdf?src-supplier=Element14, ComponentLink3URL=https://datasheet.ciiva.com/7978/1132289-7978140.pdf?src-supplier=Element14, ComponentLink4Description=https://datasheet.ciiva.com/28450/1443161-28450494.pdf?src-supplier=Element14, ComponentLink4URL=https://datasheet.ciiva.com/28450/1443161-28450494.pdf?src-supplier=Element14, Construction=Flat, Depth=0.8mm, Dissipation Factor=0.1%, Height=0.8mm, Lead Free="Lead Free", Length=1.6mm, Manufacturer Part Number=CC0603JRNPO9BN300, Mount="Surface Mount", Number of Pins=2, Packaging="Tape and Reel", Pricing 1="1=0.10000, 10=0.06800, 50=0.03700, 100=0.03020, 500=0.02160, 1000=0.01697 (USD)", Radiation Hardening=No, REACH SVHC="No SVHC", RoHS=Yes, RoHS Compliant=Yes, Series=CC, Stock 1=36700, Supplier 1=Digi-Key, Termination=SMD/SMT, Thickness=0.035inch, Voltage Rating (DC)=50V, Weight=7.1E-05oz, Width=0.031inch
C18 C19: library part CGA1A2C0G1E100D030BA, "CAP CER 10PF 25V C0G 0201", Case Code (Imperial)=0201, Case Code (Metric)=0603, Dielectric=C0G, Manufacturer=TDK, Max Operating Temperature=125°C, Min Operating Temperature=-55°C, Package Quantity=1, Ratings=AEC-Q200, Resistor Type=Ceramic, Supplier Part Number 1=445-9023-1-ND, Voltage Rating=25V, Capacitance=10pF, Case/Package=0201, Category="Ceramic Capacitors", ComponentLink1Description=https://datasheet.ciiva.com/24220/cga1a2c0g1e100d030ba-271838-24220873.pdf?src-supplier=Mouser, ComponentLink1URL=https://datasheet.ciiva.com/24220/cga1a2c0g1e100d030ba-271838-24220873.pdf?src-supplier=Mouser, Depth=0.3mm, Height=0.3mm, Length=0.6mm, Manufacturer Part Number=CGA1A2C0G1E100D030BA, Mount="Surface Mount", Packaging="Tape and Reel", Pricing 1="1=0.11000, 10=0.07900, 50=0.04340, 100=0.03540, 500=0.02530, 1000=0.01987, 2500=0.01807, 5000=0.01662 (USD)", RoHS=Yes, RoHS Compliant=Yes, Series=CGA, Stock 1=28695, Supplier 1=Digi-Key, Termination=SMD/SMT, Thickness=0.013inch, Voltage Rating (DC)=25V, Weight=6E-06oz, Width=0.3mm
C20 C21 C22: library part CL10B104KB8NNNC, "Cap Ceramic 0.1uF 50VDC X7R 10% SMD 0603 Paper T/R", Capacitance=100nF, Case Code (Imperial)=0603, Case Code (Metric)=1608, Dielectric=X7R, Manufacturer=Samsung, Max Operating Temperature=125°C, Min Operating Temperature=-55°C, Package Quantity=1, Supplier Part Number 1=1276-1000-1-ND, Tolerance=10%, Voltage=50V, Case/Package=0603, Category="Ceramic Capacitors", ComponentLink1Description=https://datasheet.ciiva.com/25803/cl10b104kb8nnnc-25803393.pdf?src-supplier=Digi-Key, ComponentLink1URL=https://datasheet.ciiva.com/25803/cl10b104kb8nnnc-25803393.pdf?src-supplier=Digi-Key, ComponentLink2Description=https://datasheet.ciiva.com/26838/getdatasheetpartid-89097-26838411.pdf?src-supplier=Verical, ComponentLink2URL=https://datasheet.ciiva.com/26838/getdatasheetpartid-89097-26838411.pdf?src-supplier=Verical, ComponentLink3Description=https://datasheet.ciiva.com/29198/456651-da-01-en-vs-kondensator-0605-29198839.pdf?src-supplier=Conrad, ComponentLink3URL=https://datasheet.ciiva.com/29198/456651-da-01-en-vs-kondensator-0605-29198839.pdf?src-supplier=Conrad, Construction=Flat, Contact Plating=Tin, Depth=0.8mm, Height=0.8mm, Lead Free="Lead Free", Length=1.6mm, Manufacturer Part Number=CL10B104KB8NNNC, Material=Ceramic, Mount="Surface Mount", Packaging="Tape and Reel", Pricing 1="1=0.10000, 10=0.03000, 50=0.01640, 100=0.01340, 500=0.00954, 1000=0.00750 (USD)", Radiation Hardening=No, RoHS=Yes, RoHS Compliant=Yes, Series=CL, Stock 1=3998791, Supplier 1=Digi-Key, Thickness=0.035inch, Voltage Rating=50V, Voltage Rating (DC)=50V, Width=0.031inch
D12: "TVS DIODE 5V 9.8V SOD923", Breakdown Voltage=5.4V, Capacitance=0.9pF, Case/Package=SOD-923-2, Clamping Voltage=9.8V, Leakage Current=1uA, Manufacturer="ON Semiconductor", Max Operating Temperature=150°C, Max Surge Current=1A, Min Operating Temperature=-55°C, Operating Supply Voltage=5V, Package Quantity=1, Peak Pulse Power=150mW, Power Line Protection=No, Resistor Type=Zener, Reverse Breakdown Voltage=5.8V, Supplier Part Number 1=ESD9L5.0ST5GOSCT-ND, Test Current=1mA, Category="ESD and Circuit Protection ICs", Clamping Voltage-Max=9.8V, ComponentLink1Description=https://datasheet.ciiva.com/15143/getdatasheetpartid-185186-15143896.pdf?src-supplier=Verical, ComponentLink1URL=https://datasheet.ciiva.com/15143/getdatasheetpartid-185186-15143896.pdf?src-supplier=Verical, ComponentLink2Description=https://datasheet.ciiva.com/4510/esd9l-d-4510647.pdf?src-supplier=Mouser, ComponentLink2URL=https://datasheet.ciiva.com/4510/esd9l-d-4510647.pdf?src-supplier=Mouser, ComponentLink3Description=https://datasheet.ciiva.com/3304/esd9l-d-3304011.pdf?src-supplier=Avnet, ComponentLink3URL=https://datasheet.ciiva.com/3304/esd9l-d-3304011.pdf?src-supplier=Avnet, ComponentLink4Description=https://datasheet.ciiva.com/16437/esd9l-d-16437835.pdf?src-supplier=Future+Electronics, ComponentLink4URL=https://datasheet.ciiva.com/16437/esd9l-d-16437835.pdf?src-supplier=Future+Electronics, ComponentLink5Description=https://datasheet.ciiva.com/339/esd9l-d-339853.pdf?src-supplier=Digi-Key, ComponentLink5URL=https://datasheet.ciiva.com/339/esd9l-d-339853.pdf?src-supplier=Digi-Key, ComponentLink6Description=https://datasheet.ciiva.com/339/esd9l-d-339854.pdf?src-supplier=Digi-Key, ComponentLink6URL=https://datasheet.ciiva.com/339/esd9l-d-339854.pdf?src-supplier=Digi-Key, ComponentLink7Description=https://datasheet.ciiva.com/11195/esd9l-d-11195342.pdf?src-supplier=Avnet, ComponentLink7URL=https://datasheet.ciiva.com/11195/esd9l-d-11195342.pdf?src-supplier=Avnet, ComponentLink8Description=https://datasheet.ciiva.com/25958/esd9l-d-25958446.pdf?src-supplier=Avnet+Europe, ComponentLink8URL=https://datasheet.ciiva.com/25958/esd9l-d-25958446.pdf?src-supplier=Avnet+Europe, ComponentLink9Description=https://datasheet.ciiva.com/339/esd9l-d-339855.pdf?src-supplier=Digi-Key, ComponentLink9URL=https://datasheet.ciiva.com/339/esd9l-d-339855.pdf?src-supplier=Digi-Key, Contact Plating=Tin,Matte, Depth=0.6mm, Diode Type=ZENER, Direction=Unidirectional, Element Configuration=Single, ESD Protection=Yes, Halogen Free="Halogen Free", Height=0.4mm, Lead Free="Lead Free", Length=0.8mm, Manufacturer Part Number=ESD9L5.0ST5G, Max Breakdown Voltage=5.4V, Max Reverse Leakage Current=1uA, Min Breakdown Voltage=5.4V, Number of Channels=1, Number of Elements=1, Number of Lines=1, Number of Pins=2, Number of Unidirectional Channels=1, Packaging="Tape and Reel", Peak Pulse Current=1A, Polarity=Unidirectional, Power Dissipation=150mW, Pricing 1="1=0.37000, 10=0.25600, 100=0.12500, 500=0.10426, 1000=0.07244, 2000=0.06278 (USD)", Radiation Hardening=No, REACH SVHC="No SVHC", Reverse Standoff Voltage=5V, RoHS=Yes, RoHS Compliant=Yes, Series="Automotive, AEC-Q101", Stock 1=558996, Supplier 1=Digi-Key, Termination=SMD/SMT, Width=0.65mm, Working Voltage=5V
FB1 FB2 FB3 FB4: "Ferrite Beads Multi-Layer 120Ohm 25% 100MHz 2A 45mOhm DCR 0603 Automotive T/R", Case Code (Imperial)=0603, Case Code (Metric)=1608, DC Resistance (DCR)=45mR, Manufacturer=TDK, Max Current Rating=2A, Max Operating Temperature=125°C, Min Operating Temperature=-55°C, Package Quantity=4000, Ratings=AEC-Q200, Supplier Part Number 1=445-172891-6-ND, Test Frequency=100MHz, Tolerance=25%, Case/Package=0603, Category="Ferrite Beads and Chips", ComponentLink1Description=https://media.digikey.com/pdf/Data%20Sheets/TDK%20PDFs/MPZ_Series_Br.pdf?src-supplier=Digi-Key, ComponentLink1URL=https://media.digikey.com/pdf/Data%20Sheets/TDK%20PDFs/MPZ_Series_Br.pdf?src-supplier=Digi-Key, ComponentLink2Description=http://www.mouser.com/ds/2/400/eads_commercial_power_mpz1608_en-923650.pdf?src-supplier=Mouser, ComponentLink2URL=http://www.mouser.com/ds/2/400/eads_commercial_power_mpz1608_en-923650.pdf?src-supplier=Mouser, ComponentLink3Description=https://product.tdk.com/info/en/catalog/datasheets/beads_automotive_power_mpz1608_en.pdf?src-supplier=Digi-Key, ComponentLink3URL=https://product.tdk.com/info/en/catalog/datasheets/beads_automotive_power_mpz1608_en.pdf?src-supplier=Digi-Key, Height=0.03inch, Impedance=120R, Length=0.063inch, Manufacturer Part Number=MPZ1608S121ATDH5, Max DC Current=2A, Mount="Surface Mount", Number of Lines=1, Packaging="Tape and Reel", Pricing 1="1=0.11000, 10=0.08600, 25=0.07720, 50=0.05660, 100=0.04890, 250=0.03860, 500=0.03260, 1000=0.02746 (USD)", RoHS=Yes, RoHS Compliant=Yes, Supplier 1=Digi-Key, Termination=SMD/SMT, Weight=7.1E-05oz, Width=0.031inch
J1: "1x2P 2P 1 1.25mm 2 -40℃~+85℃ Surface Mount SMD,P=1.25mm,Surface Mount，Right Angle Wire To Board / Wire To Wire Connector ROHS", LCSC Part Number=C2905009, Manufacturer=DEALON, Package="SMD,P=1.25mm Right Angle", ComponentLink1Description=LCSC, ComponentLink1URL=https://www.lcsc.com/product-detail/Wire-To-Board-Wire-To-Wire-Connector_DEALON-1-25-2PWB_C2905009.html, Item Type="Wire To Board Connector", Manufacturer Part Number=1.25-2PWB
J3: "CONN RCPT 26POS 0.05 GOLD SMD", Manufacturer=Harwin, Supplier Part Number 1=952-3846-1-ND, Category=Connectors, Manufacturer Part Number=M55-6012642R, Pricing 1="1=2.50000, 10=2.17600, 100=1.94480 (USD)", RoHS=Yes, RoHS Compliant=Yes, Stock 1=320, Supplier 1=Digi-Key
L1: "Ferrite Beads 120Ohm 25% 100MHz 1.2A 0.13Ohm DCR 0603 Automotive T/R", Case/Package=0603, Case Code (Metric)=1608, DC Resistance (DCR)=130mR, Manufacturer="Taiyo Yuden", Max Current Rating=1.2A, Max DC Current=900mA, Max Operating Temperature=125°C, Min Operating Temperature=-40°C, Package Quantity=4000, Ratings=AEC-Q200, Test Frequency=100MHz, Tolerance=25%, Case Code (Imperial)=0603, Category="Ferrite Beads and Chips", ComponentLink1Description=http://www.mouser.com/ds/2/396/chipbeads01_e-559265.pdf?src-supplier=Mouser, ComponentLink1URL=http://www.mouser.com/ds/2/396/chipbeads01_e-559265.pdf?src-supplier=Mouser, ComponentLink2Description=http://ds.yuden.co.jp/TYCOMPAS/ut/detail.do?productNo=FBMH1608HL121-TV&fileName=FBMH1608HL121-TV_SS&mode=specSheetDownload&src-supplier=Digi-Key, ComponentLink2URL=http://ds.yuden.co.jp/TYCOMPAS/ut/detail.do?productNo=FBMH1608HL121-TV&fileName=FBMH1608HL121-TV_SS&mode=specSheetDownload&src-supplier=Digi-Key, ComponentLink3Description=https://www.yuden.co.jp/ut/product/category/emisuppression/FBMH1608HL121-TV_SS.pdf?src-supplier=Avnet, ComponentLink3URL=https://www.yuden.co.jp/ut/product/category/emisuppression/FBMH1608HL121-TV_SS.pdf?src-supplier=Avnet, Core Material=Ferrite, Height=0.8mm, Impedance=120R, Length=0.063inch, Manufacturer Part Number=FBMH1608HL121-TV, Mount="Surface Mount", Number of Lines=1, Packaging="Tape and Reel", Pricing 1="4000=0.05939, 8000=0.05429, 16000=0.05185, 24000=0.04942, 32000=0.04698 (USD)", RoHS=Yes, RoHS Compliant=Yes, Supplier 1=Avnet, Supplier Part Number 1=FBMH1608HL121-TV, Termination=SMD/SMT, Weight=7.1E-05oz, Width=0.8mm
P1: "MACHINE PIN SOCKET 5P 2.54MM PIT", Manufacturer="Adam Equipment", Supplier Part Number 1=2057-SMC-1-05-1-GT-ND, Manufacturer Part Number=SMC-1-05-1-GT, Pricing 1="1=0.41000, 10=0.38500, 25=0.33040, 50=0.28080, 100=0.26970, 250=0.24224, 500=0.23120, 1000=0.19268, 2500=0.17616 (USD)", RoHS=No, Stock 1=1697, Supplier 1=Digi-Key
Q1 Q2: "TRANS NPN 40V 0.6A SMD SOT23-3", Case/Package=SOT-23, Collector Base Voltage (VCBO)=75V, Collector Emitter Breakdown Voltage=40V, Collector Emitter Saturation Voltage=1V, Continuous Collector Current=600mA, Current=1A, Emitter Base Voltage (VEBO)=6V, Frequency=300MHz, Manufacturer=Diodes, Max Operating Temperature=150°C, Max Power Dissipation=300mW, Min Operating Temperature=-55°C, Package Quantity=3000, Power Dissipation=350mW, Supplier Part Number 1=MMBT2222A-FDIDKR-ND, Collector Emitter Voltage (VCEO)=40V, ComponentLink1Description=http://www.diodes.com/datasheets/ds30041.pdf?src-supplier=Future+Electronics, ComponentLink1URL=http://www.diodes.com/datasheets/ds30041.pdf?src-supplier=Future+Electronics, ComponentLink2Description=http://www.diodes.com/datasheets/ds30041.pdf?src-supplier=Avnet, ComponentLink2URL=http://www.diodes.com/datasheets/ds30041.pdf?src-supplier=Avnet, ComponentLink3Description=https://www.verical.com/server-webapp/html/getDatasheet?partID=82692&src-supplier=Verical, ComponentLink3URL=https://www.verical.com/server-webapp/html/getDatasheet?partID=82692&src-supplier=Verical, ComponentLink4Description=https://www.diodes.com/assets/Datasheets/ds30041.pdf?src-supplier=Digi-Key, ComponentLink4URL=https://www.diodes.com/assets/Datasheets/ds30041.pdf?src-supplier=Digi-Key, ComponentLink5Description=http://www.diodes.com/datasheets/ds30041.pdf?src-supplier=Avnet+Europe, ComponentLink5URL=http://www.diodes.com/datasheets/ds30041.pdf?src-supplier=Avnet+Europe, ComponentLink6Description=http://www.diodes.com/datasheets/ds30041.pdf?src-supplier=Element14, ComponentLink6URL=http://www.diodes.com/datasheets/ds30041.pdf?src-supplier=Element14, Contact Plating=Matte,Tin, Current Rating=600mA, Element Configuration=Single, Gain Bandwidth Product=300MHz, Height=1mm, hFE Min=100, Lead Free="Lead Free", Length=3.05mm, Manufacturer Part Number=MMBT2222A-7-F, Max Breakdown Voltage=40V, Max Collector Current=600mA, Max Frequency=300MHz, Mount="Surface Mount", Number of Elements=1, Number of Pins=3, Packaging="Tape and Reel", Polarity=NPN, Pricing 1="1=0.15, 10=0.134, 100=0.0729, 500=0.04486, 1000=0.03059 (USD)", Radiation Hardening=No, REACH SVHC="No SVHC", Stock 1=2471182, Supplier 1=Digi-Key, Termination=SMD/SMT, Transition Frequency=300MHz, Voltage=40V, Voltage Rating (DC)=40V, Weight=0.000282oz, Width=1.4mm
R1 R6 R9 R10 R11 R12 R13 R14 R17 R18 R19 R20 R21 R22 R23 R24 R25 R26 R28 R29 R30 R31 R32 R33 R34 R35 R36 R37 R38 R39 R40 R41 R42 R43 R44 R45 R46 R47 R48: library part RC0201JR-070RL, "RES SMD 0 OHM JUMPER 1/20W 0201", Case Code (Imperial)=0201, Case Code (Metric)=0603, Manufacturer=Yageo, Max Operating Temperature=125°C, Max Power Dissipation=50mW, Min Operating Temperature=-55°C, Package Quantity=10000, Resistance Tolerance=5%, Resistor Type="Thick Film", Supplier Part Number 1=311-0.0NCT-ND, Voltage Rating=25V, Case/Package=0201, Category="Chip SMD Resistors", ComponentLink1Description=https://datasheet.ciiva.com/7672/1563626-7672247.pdf?src-supplier=Element14, ComponentLink1URL=https://datasheet.ciiva.com/7672/1563626-7672247.pdf?src-supplier=Element14, ComponentLink2Description=https://datasheet.ciiva.com/7660/1421516-7660808.pdf?src-supplier=Element14, ComponentLink2URL=https://datasheet.ciiva.com/7660/1421516-7660808.pdf?src-supplier=Element14, ComponentLink3Description=https://datasheet.ciiva.com/7672/1563626-7672248.pdf?src-supplier=Element14, ComponentLink3URL=https://datasheet.ciiva.com/7672/1563626-7672248.pdf?src-supplier=Element14, ComponentLink4Description=https://datasheet.ciiva.com/16855/pyu-rc0201-51-rohs-l-8-16855994.pdf?src-supplier=Avnet+Europe, ComponentLink4URL=https://datasheet.ciiva.com/16855/pyu-rc0201-51-rohs-l-8-16855994.pdf?src-supplier=Avnet+Europe, ComponentLink5Description=https://datasheet.ciiva.com/28419/pyu-rc0201-51-rohs-l-8-28419660.pdf?src-supplier=Avnet+Europe, ComponentLink5URL=https://datasheet.ciiva.com/28419/pyu-rc0201-51-rohs-l-8-28419660.pdf?src-supplier=Avnet+Europe, ComponentLink6Description=https://datasheet.ciiva.com/46391/1421516-46391340.pdf?src-supplier=Element14, ComponentLink6URL=https://datasheet.ciiva.com/46391/1421516-46391340.pdf?src-supplier=Element14, ComponentLink7Description=https://datasheet.ciiva.com/8896/pyu-rc0201-51-rohs-l-8-8896143.pdf?src-supplier=Avnet, ComponentLink7URL=https://datasheet.ciiva.com/8896/pyu-rc0201-51-rohs-l-8-8896143.pdf?src-supplier=Avnet, Construction=Rectangular, Contact Plating=Tin,Matte, Depth=0.3mm, Features="Moisture Resistant", Height=0.01inch, Lead Free="Lead Free", Length=0.6mm, Manufacturer Part Number=RC0201JR-070RL, Military Standard=Not, Number of Terminations=2, Packaging="Tape and Reel", Power Rating=50mW, Pricing 1="1=0.10000, 10=0.03600, 25=0.02640, 50=0.02000, 100=0.01480, 250=0.01128, 500=0.00904, 1000=0.00665, 5000=0.00477 (USD)", Radiation Hardening=No, REACH SVHC=Unknown, Resistance=0R, RoHS=Yes, RoHS Compliant=Yes, Series=RC, Size Code=0201, Stock 1=11079, Supplier 1=Digi-Key, Termination=SMD/SMT, Tolerance=5%, Voltage Rating (DC)=25V, Weight=6E-06oz, Width=0.012inch
R2 R27 RF1 RF2 RF3: library part RC0603FR-0710KL, "RES SMD 10K Ohm 1% 1/10W 0603", Case/Package=0603, Case Code (Metric)=1608, Manufacturer=Yageo, Max Operating Temperature=155°C, Max Power Dissipation=100mW, Min Operating Temperature=-55°C, Resistance=10kR, Resistance Tolerance=1%, Resistor Type="Thick Film", Supplier Part Number 1=311-10.0KHRCT-ND, Temperature Coefficient=100ppm/°C, Voltage Rating=75V, Voltage Rating (DC)=50V, Case Code (Imperial)=0603, Category="Chip SMD Resistors", ComponentLink1Description=https://datasheet.ciiva.com/7660/38590-7660789.pdf?src-supplier=Element14, ComponentLink1URL=https://datasheet.ciiva.com/7660/38590-7660789.pdf?src-supplier=Element14, ComponentLink2Description=https://datasheet.ciiva.com/7983/443971-7983596.pdf?src-supplier=Element14, ComponentLink2URL=https://datasheet.ciiva.com/7983/443971-7983596.pdf?src-supplier=Element14, ComponentLink3Description=https://datasheet.ciiva.com/22747/443971-22747519.pdf?src-supplier=Element14, ComponentLink3URL=https://datasheet.ciiva.com/22747/443971-22747519.pdf?src-supplier=Element14, ComponentLink4Description=https://datasheet.ciiva.com/46440/1868787-46440891.pdf?src-supplier=Element14, ComponentLink4URL=https://datasheet.ciiva.com/46440/1868787-46440891.pdf?src-supplier=Element14, ComponentLink5Description=https://datasheet.ciiva.com/7746/1738695-7746239.pdf?src-supplier=Element14, ComponentLink5URL=https://datasheet.ciiva.com/7746/1738695-7746239.pdf?src-supplier=Element14, ComponentLink6Description=https://datasheet.ciiva.com/15189/getdatasheetpartid-409289-15189591.pdf?src-supplier=Verical, ComponentLink6URL=https://datasheet.ciiva.com/15189/getdatasheetpartid-409289-15189591.pdf?src-supplier=Verical, Construction=Rectangular, Depth=0.8mm, Features="Moisture Resistant", Height=0.45mm, Lead Free="Lead Free", Lead Pitch=0.3mm, Length=1.6mm, Manufacturer Part Number=RC0603FR-0710KL, Military Standard=Not, Number of Pins=2, Number of Terminations=2, Packaging="Tape and Reel", Power Rating=100mW, Pricing 1="1=0.10000, 10=0.02400, 100=0.00970, 1000=0.00436, 2500=0.00378 (USD)", REACH SVHC=Unknown, RoHS=Yes, RoHS Compliant=Yes, Series=RC, Size Code=0603, Stock 1=25249139, Supplier 1=Digi-Key, Termination=SMD/SMT, Tolerance=1%, Weight=7.1E-05oz, Width=0.8mm
R3: library part RMCF0201FT806R, "Res Thick Film 0201 806 Ohm 1% 1/20W ±200ppm/°C Molded SMD SMD Paper T/R", Case Code (Imperial)=0201, Case Code (Metric)=0603, Manufacturer="Stackpole Electronics", Max Operating Temperature=125°C, Max Power Dissipation=50mW, Min Operating Temperature=-55°C, Package Quantity=10000, Resistor Type="Thick Film", Supplier Part Number 1=RMCF0201FT806RCT-ND, Temperature Coefficient=200ppm/°C, Tolerance=1%, Case/Package=0201, Category="Chip SMD Resistors", ComponentLink1Description=https://www.seielect.com/catalog/SEI-RMCF_RMCP.pdf?src-supplier=Avnet, ComponentLink1URL=https://www.seielect.com/catalog/SEI-RMCF_RMCP.pdf?src-supplier=Avnet, ComponentLink2Description=https://www.seielect.com/catalog/SEI-Packaging.pdf?src-supplier=Digi-Key, ComponentLink2URL=https://www.seielect.com/catalog/SEI-Packaging.pdf?src-supplier=Digi-Key, ComponentLink3Description=https://www.seielect.com/Catalog/SEI-RMCF_RMCP.pdf?src-supplier=Digi-Key, ComponentLink3URL=https://www.seielect.com/Catalog/SEI-RMCF_RMCP.pdf?src-supplier=Digi-Key, ComponentLink4Description=http://www.seielect.com/Catalog/SEI-RMCF_RMCP.pdf?src-supplier=Digi-Key, ComponentLink4URL=http://www.seielect.com/Catalog/SEI-RMCF_RMCP.pdf?src-supplier=Digi-Key, Contact Plating=Tin,Matte, Height=0.009inch, Length=0.024inch, Manufacturer Part Number=RMCF0201FT806R, Mount="Surface Mount", Number of Terminations=2, Packaging="Tape and Reel", Pricing 1="1=0.10000, 10=0.02700, 100=0.01090, 1000=0.00488, 2500=0.00423, 5000=0.00350 (USD)", Radiation Hardening=No, Resistance=806R, RoHS=Yes, RoHS Compliant=Yes, Series=RMCF, Stock 1=9465, Supplier 1=Digi-Key, Width=0.012inch
R4 R5: library part RC0603JR-071KL, "RES SMD 1K 0.1W 0603  75 V, Thick Film", Case/Package=0603, Case Code (Metric)=1608, Manufacturer=Yageo, Max Operating Temperature=155°C, Min Operating Temperature=-55°C, Package Quantity=5000, Power Rating=100mW, Resistance=1kR, Resistance Tolerance=5%, Resistor Type="Thick Film", Supplier Part Number 1=311-1.0KGRCT-ND, Temperature Coefficient=100ppm/°C, Voltage Rating=50V, Body Length=1.6mm, Case Code (Imperial)=0603, Category="Chip SMD Resistors", Construction=Rectangular, Contact Plating=Tin,Matte, Depth=0.8mm, Height=0.45mm, Lead Free="Lead Free", Length=1.6mm, Manufacturer Part Number=RC0603JR-071KL, Military Standard=Not, Number of Pins=2, Packaging="Tape and Reel", Pricing 1="1=0.10000, 10=0.02000, 100=0.00800, 1000=0.00360, 2500=0.00312 (USD)", Radiation Hardening=No, REACH SVHC=Unknown, RoHS=Yes, RoHS Compliant=Yes, Series=RC, Size Code=0603, Stock 1=1727570, Supplier 1=Digi-Key, Termination=SMD/SMT, Tolerance=5%, Voltage Rating (DC)=50V, Width=0.8mm
R7 R8: library part RC0603FR-0757R6L, "RES SMD 57.6 OHM 1% 1/10W 0603", Case Code (Imperial)=0603, Case Code (Metric)=1608, Manufacturer=Yageo, Max Operating Temperature=155°C, Max Power Dissipation=100mW, Min Operating Temperature=-55°C, Package Quantity=1, Resistance=57.6R, Resistor Type="Thick Film", Supplier Part Number 1=311-57.6HRCT-ND, Temperature Coefficient=100ppm/°C, Tolerance=1%, Voltage Rating=50V, Case/Package=0603, Category="Chip SMD Resistors", ComponentLink1Description=https://datasheet.ciiva.com/2455/pyu-r-int-thick-7-2455376.pdf?src-supplier=Digi-Key, ComponentLink1URL=https://datasheet.ciiva.com/2455/pyu-r-int-thick-7-2455376.pdf?src-supplier=Digi-Key, ComponentLink2Description=https://datasheet.ciiva.com/28398/pyu-rc0603-51-rohs-l-4-28398203.pdf?src-supplier=Avnet+Europe, ComponentLink2URL=https://datasheet.ciiva.com/28398/pyu-rc0603-51-rohs-l-4-28398203.pdf?src-supplier=Avnet+Europe, ComponentLink3Description=https://datasheet.ciiva.com/2455/pyu-r-int-thick-7-2455374.pdf?src-supplier=Digi-Key, ComponentLink3URL=https://datasheet.ciiva.com/2455/pyu-r-int-thick-7-2455374.pdf?src-supplier=Digi-Key, ComponentLink4Description=https://datasheet.ciiva.com/12561/rc0603-272842-12561230.pdf?src-supplier=Mouser, ComponentLink4URL=https://datasheet.ciiva.com/12561/rc0603-272842-12561230.pdf?src-supplier=Mouser, ComponentLink5Description=https://datasheet.ciiva.com/2455/pyu-r-int-thick-7-2455375.pdf?src-supplier=Digi-Key, ComponentLink5URL=https://datasheet.ciiva.com/2455/pyu-r-int-thick-7-2455375.pdf?src-supplier=Digi-Key, Construction=Rectangular, Contact Plating=Tin,Matte, Depth=0.8mm, Features="Moisture Resistant", Height=0.022inch, Lead Free="Lead Free", Length=1.6mm, Manufacturer Part Number=RC0603FR-0757R6L, Military Standard=Not, Number of Terminations=2, Packaging="Tape and Reel", Power Rating=100mW, Pricing 1="1=0.10000, 10=0.02400, 100=0.00970, 1000=0.00436, 2500=0.00378 (USD)", RoHS=Yes, RoHS Compliant=Yes, Series=RC, Stock 1=27520, Supplier 1=Digi-Key, Termination=SMD/SMT, Voltage Rating (DC)=50V, Width=0.031inch
R15: library part ERJ3EKF3011V, "RES SMD 3.01K OHM 1% 1/10W 0603", Case Code (Imperial)=0603, Case Code (Metric)=1608, Manufacturer=Panasonic, Manufacturer Part Number=ERJ-3EKF3011V, Max Operating Temperature=155°C, Max Power Dissipation=100mW, Min Operating Temperature=-55°C, Package Quantity=1, Resistance=3.01kR, Resistance Tolerance=1%, Resistor Type="Thick Film", Supplier Part Number 1=P3.01KHCT-ND, Temperature Coefficient=100ppm/°C, Voltage Rating=75V, Voltage Rating (DC)=50V, Case/Package=0603, Category="Chip SMD Resistors", ComponentLink1Description=https://datasheet.ciiva.com/48530/aoa0000ce2-48530997.pdf?src-supplier=Avnet, ComponentLink1URL=https://datasheet.ciiva.com/48530/aoa0000ce2-48530997.pdf?src-supplier=Avnet, ComponentLink2Description=https://datasheet.ciiva.com/9117/aoa0000ce2-9117094.pdf?src-supplier=Avnet, ComponentLink2URL=https://datasheet.ciiva.com/9117/aoa0000ce2-9117094.pdf?src-supplier=Avnet, ComponentLink3Description=https://datasheet.ciiva.com/24069/aoa0000ce2-24069032.pdf?src-supplier=Mouser, ComponentLink3URL=https://datasheet.ciiva.com/24069/aoa0000ce2-24069032.pdf?src-supplier=Mouser, ComponentLink4Description=https://datasheet.ciiva.com/46377/426256-46377976.pdf?src-supplier=Element14, ComponentLink4URL=https://datasheet.ciiva.com/46377/426256-46377976.pdf?src-supplier=Element14, ComponentLink5Description=https://datasheet.ciiva.com/16762/70260748-16762377.pdf?src-supplier=Allied+Electronics, ComponentLink5URL=https://datasheet.ciiva.com/16762/70260748-16762377.pdf?src-supplier=Allied+Electronics, ComponentLink6Description=https://datasheet.ciiva.com/16511/aoa0000ce2-16511707.pdf?src-supplier=Avnet+Asia, ComponentLink6URL=https://datasheet.ciiva.com/16511/aoa0000ce2-16511707.pdf?src-supplier=Avnet+Asia, ComponentLink7Description=https://datasheet.ciiva.com/28695/1678782-28695803.pdf?src-supplier=Element14, ComponentLink7URL=https://datasheet.ciiva.com/28695/1678782-28695803.pdf?src-supplier=Element14, ComponentLink8Description=https://datasheet.ciiva.com/16773/70260748-16773212.pdf?src-supplier=Allied+Electronics, ComponentLink8URL=https://datasheet.ciiva.com/16773/70260748-16773212.pdf?src-supplier=Allied+Electronics, ComponentLink9Description=https://datasheet.ciiva.com/5969/426256-5969261.pdf?src-supplier=Farnell, ComponentLink9URL=https://datasheet.ciiva.com/5969/426256-5969261.pdf?src-supplier=Farnell, Construction=Rectangular, Contact Plating=Tin, Depth=0.8mm, Features="Automotive AEC-Q200", Height=0.022inch, Lead Free="Lead Free", Length=1.6mm, Military Standard=Not, Mount="Surface Mount", Number of Terminations=2, Packaging="Tape and Reel", Power Rating=100mW, Pricing 1="1=0.10000, 10=0.03900, 100=0.01590, 1000=0.00713, 2500=0.00619 (USD)", Radiation Hardening=No, REACH SVHC="No SVHC", RoHS=Yes, RoHS Compliant=Yes, Series=ERJ, Stock 1=64217, Supplier 1=Digi-Key, Technology="THICK FILM", Termination=SMD/SMT, Tolerance=1%, Width=0.031inch, Working Voltage=75V